# Altium PCB PCB1.PcbDoc
Units mm, origin at the board's own origin, x right, y up, seen from the top; angles counter-clockwise.
Board outline 82 x 67 mm, 2 copper layers (Top Layer, Bottom Layer); 41 components, 35 nets, 232 pads, 99 vias.
Unrouted connection lines stored in the file: 26.
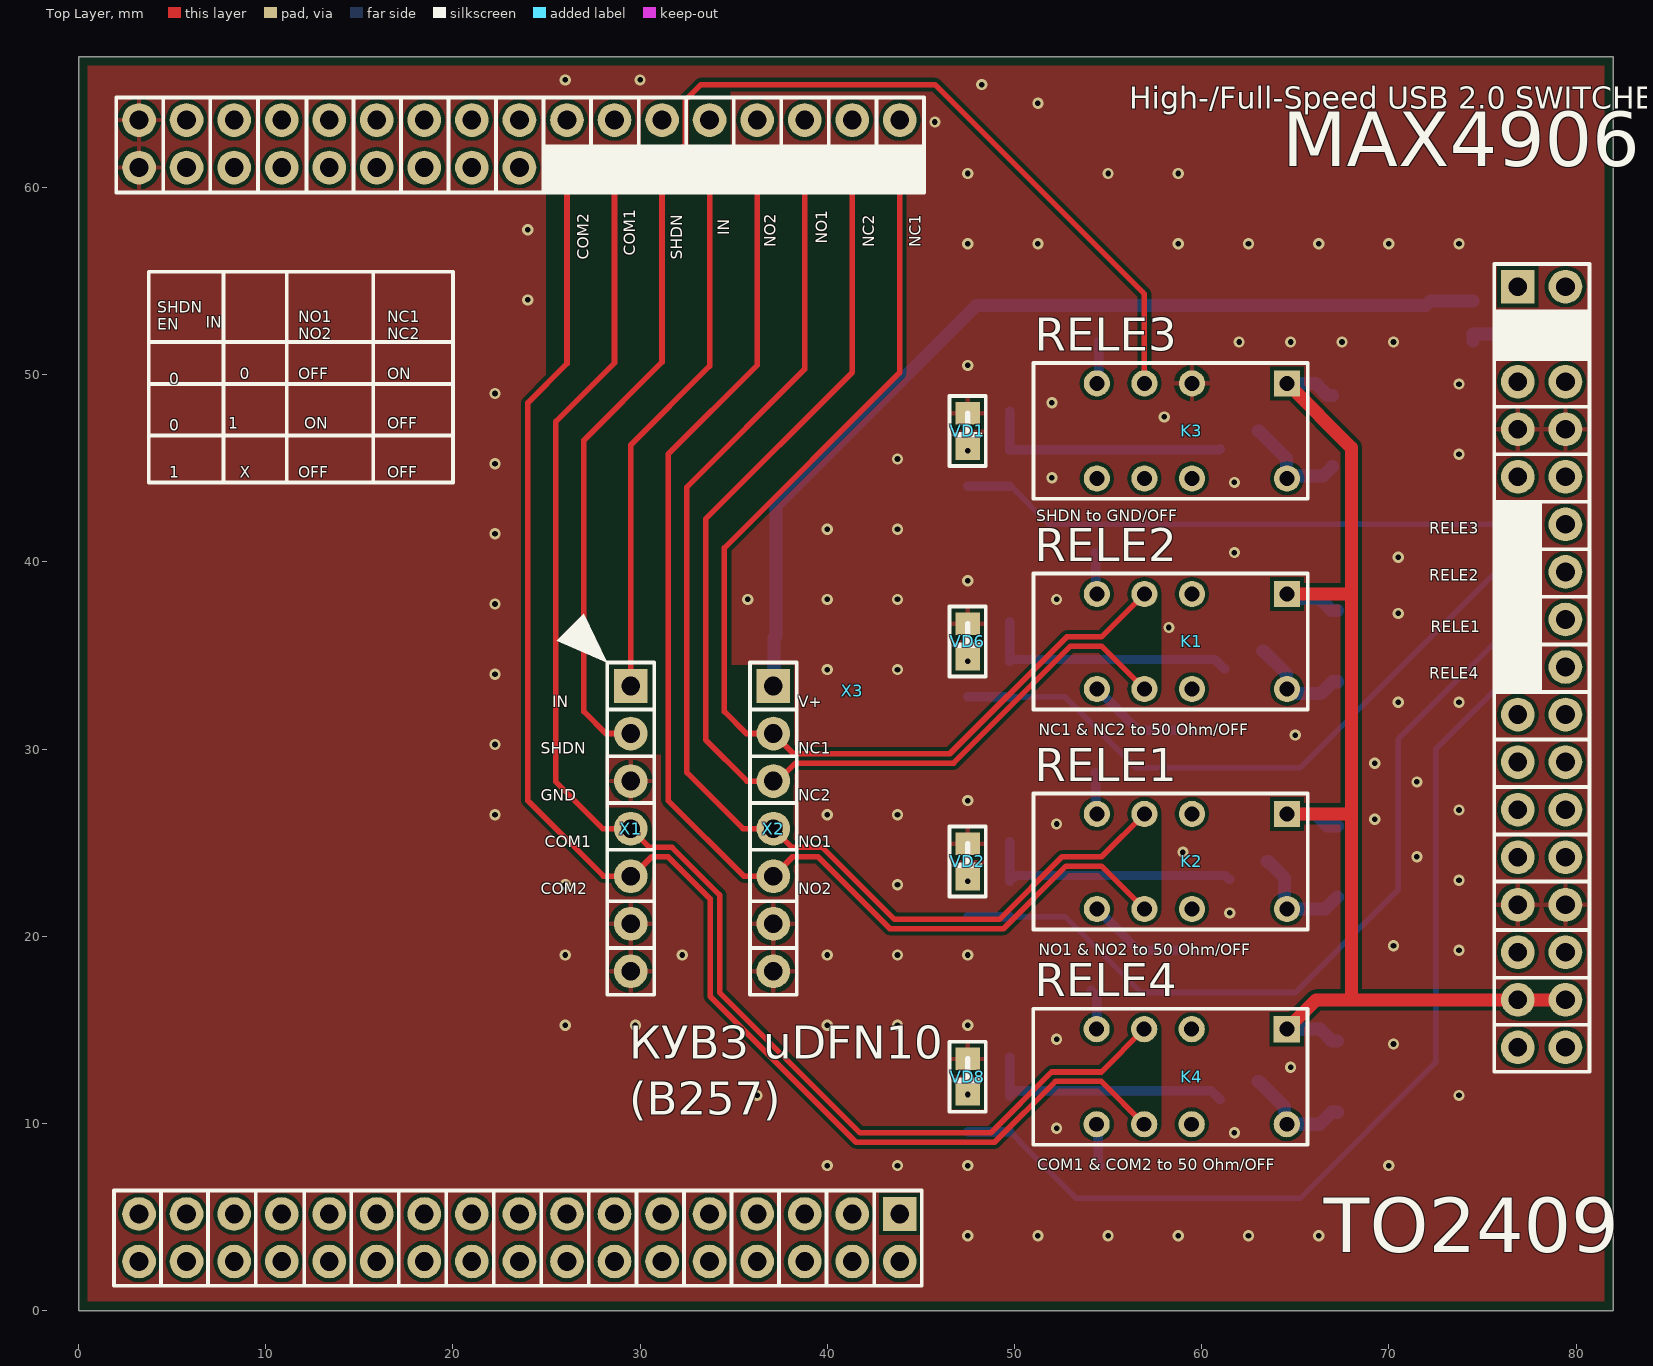
[diagram p0: Top Layer view]
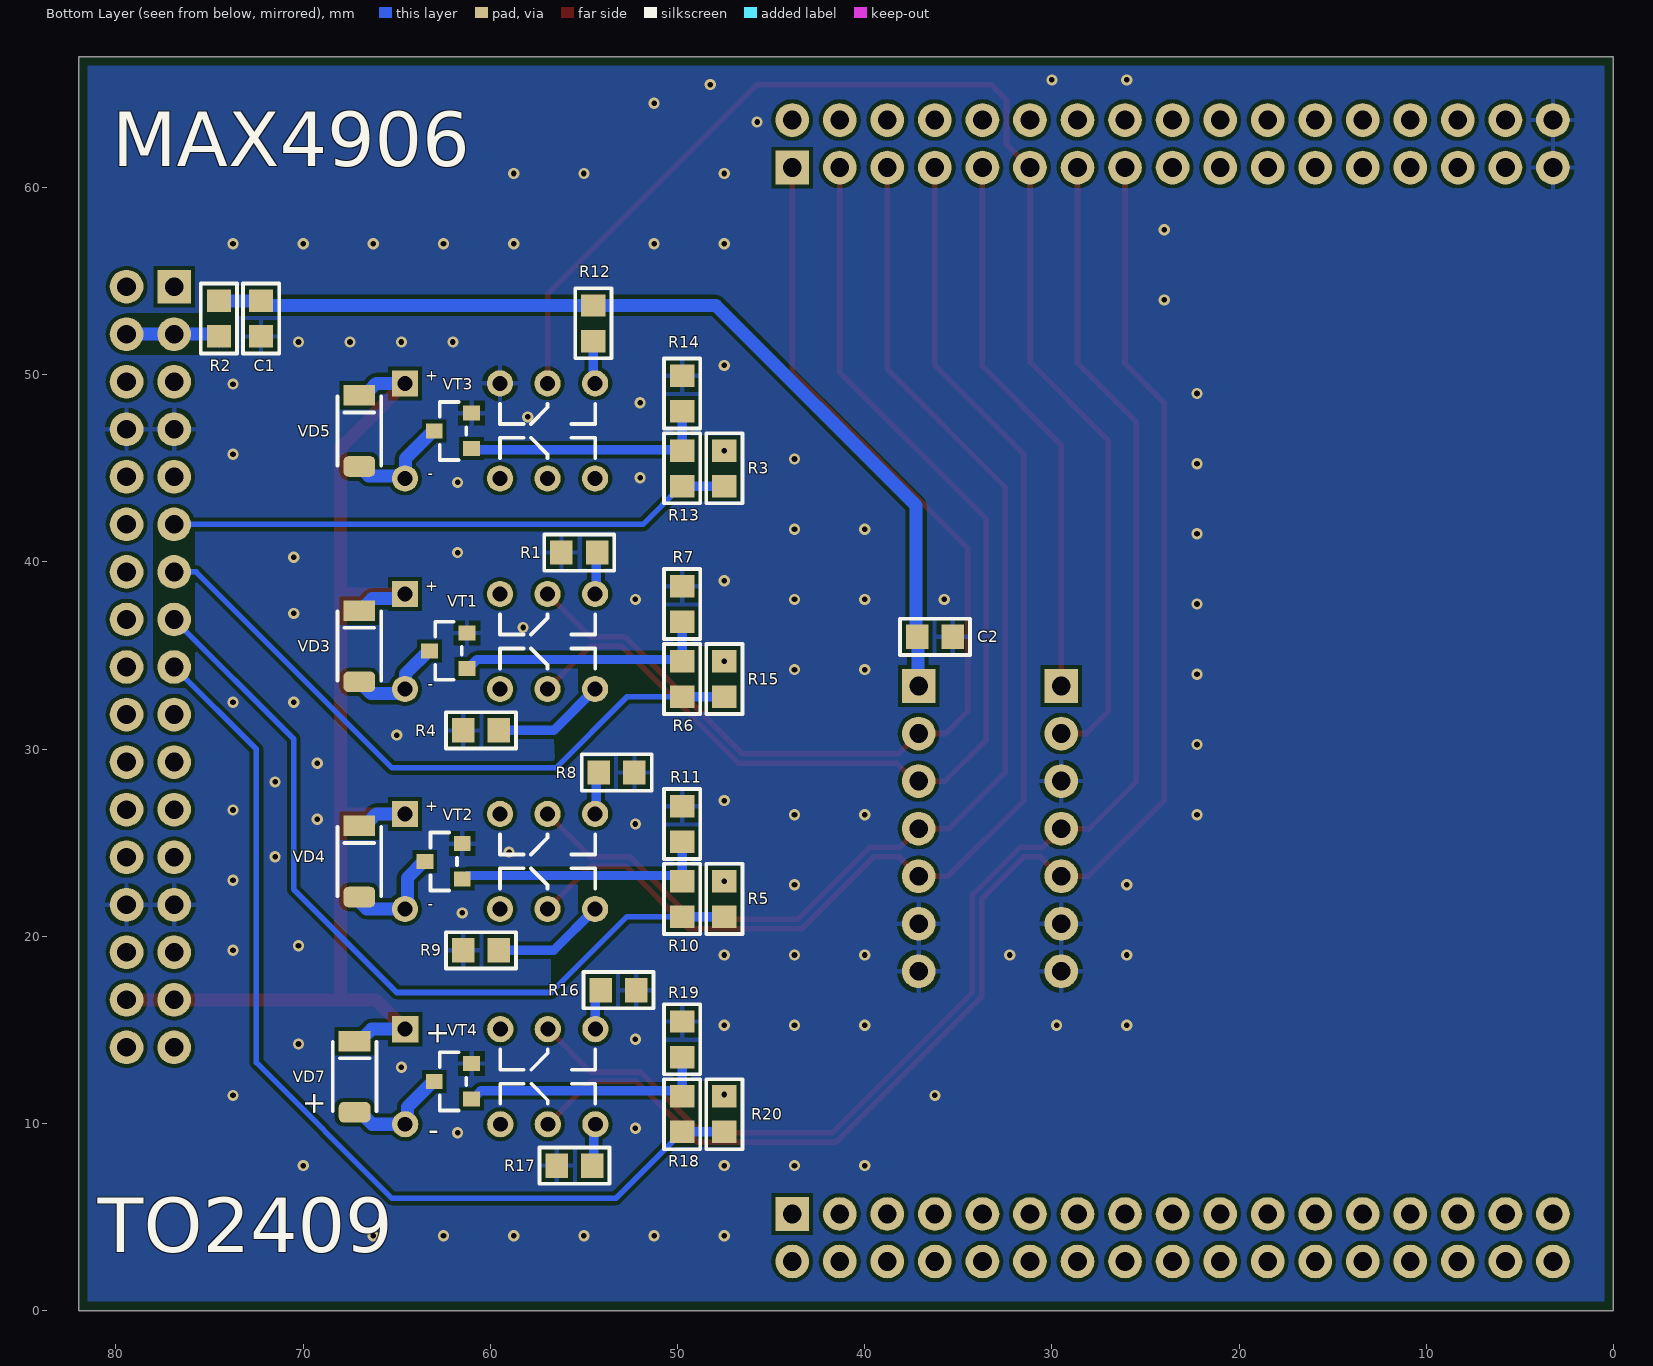
[diagram p1: Bottom Layer view, seen from below]

## Layer stack, top to bottom
Top Solder: solder mask 0.0102, Solder Resist, Dk 3.5
Top Layer: signal copper 0.0356
Dielectric 1: dielectric 0.32, FR-4, Dk 4.8
Bottom Layer: signal copper 0.0356
Bottom Solder: solder mask 0.0102, Solder Resist, Dk 3.5

## Board outline
0,0 82,0 82,67 0,67

## Design rules (kind name [scope] priority, off if disabled: settings)
Clearance [All] p1: gap=0.2 ignorepadtopadclearanceinfootprint=FALSE except(0: Arc-Hole Track-Hole SMDPad-Hole THPad-Hole Via-Hole Fill-Hole Poly-Hole Region-Hole Text-Hole)
PolygonConnect [InNet('GND')] p1: thpad.connectstyle=Relief thpad.reliefconductorwidth=0.254 thpad.reliefentries=4 thpad.polygonreliefangle="90 Angle" thpad.airgapwidth=0.254 smdpad.connectstyle=Relief smdpad.reliefconductorwidth=0.254 smdpad.reliefentries=4 smdpad.polygonreliefangle="90 Angle" smdpad.airgapwidth=0.254 via.connectstyle=Direct via.reliefconductorwidth=0.254 via.reliefentries=4 via.polygonreliefangle="90 Angle" via.airgapwidth=0.254
RoutingVias [All] p1: holewidth=0.3 width=0.6 viastyle="Through Hole" minholewidth=0.3 minwidth=0.6 maxholewidth=0.6 maxwidth=1.2
SilkToSilkClearance [All] p1: silktosilkclearance=0
SilkToSolderMaskClearance [IsPad] p1: minsilkscreentomaskgap=0 clearancetoexposedcopper=TRUE
SolderMaskExpansion [All] p1: expansion=0.102 istentingtop=FALSE
Width [All] p1: maxlimit=1 minlimit=0.2 preferedwidth=0.3
28 further rules are at their usual default settings.

## Components (designator, comment, footprint, x,y, rotation, side; value= is the part's Value field where it differs from the comment)
C1 "10uF" 0805 72.25,53 r270 bottom
C2 "10nF" 0805 36.25,36 r180 bottom
K1 "V23079A1001B301 TE" V23079A1001B301 58.262,35.75 r180 top
K2 "V23079A1001B301 TE" V23079A1001B301 58.262,24 r180 top
K3 "V23079A1001B301 TE" V23079A1001B301 58.262,47 r180 top
K4 "V23079A1001B301 TE" V23079A1001B301 58.25,12.5 r180 top
R1 "50" 0805 55.25,40.5 r0 bottom
R2 "1" 0805 74.5,53 r90 bottom
R3 "1.5k" 0805 47.5,45 r90 bottom
R4 "50" 0805 60.5,31 r0 bottom
R5 "1.5k" 0805 47.5,22 r90 bottom
R6 "1k" 0805 49.75,33.75 r90 bottom
R7 "20k" 0805 49.75,37.75 r90 bottom
R8 "50" 0805 53.25,28.75 r180 bottom
R9 "50" 0805 60.5,19.25 r0 bottom
R10 "1k" 0805 49.75,22 r90 bottom
R11 "20k" 0805 49.75,26 r90 bottom
R12 "10k" 0805 54.5,52.75 r90 bottom
R13 "1k" 0805 49.75,45 r90 bottom
R14 "20k" 0805 49.75,49 r90 bottom
R15 "1.5k" 0805 47.5,33.75 r90 bottom
R16 "50" 0805 53.154,17.123 r180 bottom
R17 "50" 0805 55.5,7.75 r0 bottom
R18 "1k" 0805 49.75,10.5 r90 bottom
R19 "20k" 0805 49.75,14.5 r90 bottom
R20 "1.5k" 0805 47.5,10.5 r90 bottom
VD1 "LED(0805)" 0805(LED) 47.5,47 r90 top
VD2 "LED(0805)" 0805(LED) 47.5,24 r90 top
VD3 "LL4148 NXP" SOD80C 67,35.5 r90 bottom
VD4 "LL4148 NXP" SOD80C 67,24 r90 bottom
VD5 "LL4148 NXP" SOD80C 67,47 r90 bottom
VD6 "LED(0805)" 0805(LED) 47.5,35.75 r90 top
VD7 "LL4148 NXP" SOD80C 67.25,12.5 r90 bottom
VD8 "LED(0805)" 0805(LED) 47.5,12.5 r90 top
VT1 "MMBT5551L" SOT-23 62.25,35.25 r90 bottom
VT2 "MMBT5551L" SOT-23 62.5,24 r90 bottom
VT3 "MMBT5551L" SOT-23 62,47 r90 bottom
VT4 "MMBT5551L" SOT-23 62,12.25 r90 bottom
X1 "PBS-7" PBS7-2.54 29.5,33.372 r0 top
X2 "PBS-7" PBS7-2.54 37.12,33.372 r0 top
X3 "FORMULA" FORMULA 31.693,31.847 r0 top locked

## Footprints (in the part's own frame and the unit in brackets; to place one, negate y for a bottom-side part, rotate by r counter-clockwise, add the part's x,y. Pads: shape width x height; smd on the part's side, far side on the other; paste and mask are expansions set on the pad)
0805 [mm]
  rect 1.2x1.3 smd: 1(-0.95,0) 2(0.95,0)
  silkscreen extent -1.87,-0.97 1.87,0.97, body extent -1.05,-0.63 0.95,0.63, height 0.55
0805(LED) [mm]
  rect 1.2x1.3 smd: 1(-0.95,0) 2(0.95,0)
  silkscreen extent -1.87,-0.97 1.87,0.97, body extent -1.03,-0.41 1.03,0.5, height 0.85
FORMULA [mm]
  rect 1.8x1.8 hole 1: 1(12.18,29.22) VDDF(12.18,-26.68) VEEF(45.2,22.86)
  round 1.8 hole 1: 2(9.64,29.22) 3(7.1,29.22) 4(4.56,29.22) 5(2.02,29.22) 6(-0.52,29.22) 7(-3.06,29.22) 8(-5.6,29.22) 9(-8.14,29.22) 10(-10.68,29.22) 11(-13.22,29.22) 12(-15.76,29.22) 13(-18.3,29.22) 14(-20.84,29.22) 15(-23.38,29.22) 16(-25.92,29.22) 17(12.18,31.76) 18(9.64,31.76) 19(7.1,31.76) 20(4.56,31.76) 21(2.02,31.76) 22(-0.52,31.76) 23(-3.06,31.76) 24(-5.6,31.76) 25(-8.14,31.76) 26(-10.68,31.76) 27(-13.22,31.76) 28(-15.76,31.76) 29(-18.3,31.76) 30(-20.84,31.76) 31(-23.38,31.76) 32(-25.92,31.76) 33(-28.46,-29.22) 34(-25.92,-29.22) 35(-23.38,-29.22) 36(-20.84,-29.22) 37(-18.3,-29.22) 38(-15.76,-29.22) 39(-13.22,-29.22) 40(-10.68,-29.22) 41(-8.14,-29.22) 42(-5.6,-29.22) 43(-3.06,-29.22) 44(-0.52,-29.22) 45(2.02,-29.22) 46(4.56,-29.22) 47(7.1,-29.22) 48(9.64,-29.22) 49(-28.46,-26.68) 50(-25.92,-26.68) 51(-23.38,-26.68) 52(-20.84,-26.68) 53(-18.3,-26.68) 54(-15.76,-26.68) 55(-13.22,-26.68) 56(-10.68,-26.68) 57(-8.14,-26.68) 58(-5.6,-26.68) 59(-3.06,-26.68) 60(-0.52,-26.68) 61(2.02,-26.68) 62(4.56,-26.68) 63(7.1,-26.68) 64(9.64,-26.68) +5V(45.2,-15.24) +5V(47.74,-15.24) +5V_VCCF(45.2,20.32) +5V_VCCS(47.74,20.32) +5V_VDDF(45.2,17.78) +5V_VDDS(47.74,17.78) +12V(45.2,-12.7) +12V(47.74,-12.7) -12V(45.2,-17.78) -12V(47.74,-17.78) GND(-28.46,29.22) GND(-28.46,31.76) GND(45.2,-10.16) GND(45.2,15.24) GND(47.74,-10.16) GND(47.74,15.24) IN-OUT1(47.74,10.16) IN-OUT2(47.74,7.62) IN-OUT3(47.74,5.08) IN-OUT4(47.74,2.54) IN-OUT5(47.74,0) IN-OUT6(47.74,-2.54) IN-OUT7(47.74,-5.08) IN-OUT8(47.74,-7.62) NC(45.2,12.7) NC(47.74,12.7) OUT1(45.2,10.16) OUT2(45.2,7.62) OUT3(45.2,5.08) OUT4(45.2,2.54) OUT5(45.2,0) OUT6(45.2,-2.54) OUT7(45.2,-5.08) OUT8(45.2,-7.62) VDDS(12.18,-29.22) VEES(47.74,22.86)
  silkscreen extent -29.8,-30.51 49.02,32.97, body extent -29.79,-30.4 48.98,32.92, height 3
PBS7-2.54 [mm]
  rect 1.8x1.8 hole 1: 1(0,0)
  round 1.8 hole 1: 2(0,-2.54) 3(0,-5.08) 4(0,-7.62) 5(0,-10.16) 6(0,-12.7) 7(0,-15.24)
  silkscreen extent -1.25,-16.5 1.25,1.25
SOD80C [mm]
  rrect50% 1.1x1.7 smd: 1(-1.9,0)
  rect 1.1x1.7 smd: 2(1.9,0)
  silkscreen extent -1.85,-1.17 1.85,1.17, body extent -1.9,-0.8 1.8,0.8, height 1.55
SOT-23 [mm]
  rect 0.8x0.9 smd: 1(-0.95,-1) 1(-0.95,-1) 2(0.95,-1) 2(0.95,-1) 3(0,1) 3(0,1)
  silkscreen extent -1.55,-0.72 1.55,0.7, body extent -1.5,-1.25 1.5,1.25, height 1.05
V23079A1001B301 [mm]
  rect 1.4x1.4 hole 0.8: 1(-6.3,-2.54)
  round 1.4 hole 0.8: 3(-1.22,-2.54) 4(1.32,-2.54) 5(3.86,-2.54) 8(3.86,2.54) 9(1.32,2.54) 10(-1.22,2.54) 12(-6.3,2.54)
  silkscreen extent -7.4,-3.63 7.25,3.63, body extent -7.25,-3.6 7.25,3.6, height 9.4

## Part data
C1 C2: library part C0805, ComponentHeigt=1.3, Firme=AVX, KIND=Конденсатор, Leadform=SMD, Packaging=0805
R1 R2 R3 R4 R5 R6 R7 R8 R9 R10 R11 R12 R13 R14 R15 R16 R17 R18 R19 R20: library part "R0805 Yageo", ComponentHeigt=0.6, Firme=Yageo, KIND=Резистор, Leadform=SMD, Packaging=0805
VD1 VD2 VD6 VD8: ComponentHeigt=0.75, Firme=Kingbright, KIND="Светодиод L-1154GD Kingbright", Leadform="в отверстия", NN=24003000
VD3 VD4 VD5 VD7: Component Link=http://www.nxp.com, ComponentHeigt=1.6, Firme=NXP, KIND="Диод LL4148 NXP", Leadform=SMD, NN=24009301, Packaging=SOD-80C
VT1 VT2 VT3 VT4: ComponentHeigt=1.1, Firme=ONS, KIND="Транзистор MMBT5551L*G ONS", Leadform=SMD, NN=24007468, Packaging=SOT-23

## Via types
v1: diameter 0.6, hole 0.3, Top Layer to Bottom Layer, tented both sides, 99 vias

## Nets (pads, with @x,y where several pads share a name; then routed paths per layer and width w, separated by ;. In a path a pad name is that pad's centre, name@x,y a point inside that pad or via, vN(x,y) a via of type N, cw(c..) or ccw(c..) an arc to the next point about the centre after c; other vN are vias at no path point)
+3.3V_VCC: R2.1 X3.+5V_VCCF X3.+5V_VCCS | length 5.3
  Bottom Layer w0.7: R2.1@74.484,52.067 R2.1 ; R2.1@74.5,51.8 74.5,52.167 X3.+5V_VCCF ; X3.+5V_VCCF@76.877,52.183 X3.+5V_VCCF ; X3.+5V_VCCS X3.+5V_VCCF
+5V_CONST: K1.1 K2.1 K3.1 K4.1 VD3.2 VD4.2 VD5.2 VD7.2 X3.+5V | length 68
  Top Layer w0.7: K4.1 66.117,16.607 76.893,16.607 X3.+5V@79.433,16.607 ; K2.1 67.75,26.54 ; K1.1 68,38.29 ; K3.1 68,46.102 68,38.29 ; 68,16.75 68,38.29
  Bottom Layer w0.7: K4.1 66.34,15.04 66.75,14.63 66.75,14.6 66.95,14.4 VD7.2 ; K2.1 66.09,26.54 66.5,26.13 66.5,26.1 66.7,25.9 VD4.2 VD4.2@67.25,25.9 ; K1.1@64.562,38.04 66.312,38.04 66.75,37.602 66.75,37.6 66.95,37.4 VD3.2 VD3.2@67.25,37.4 ; K3.1 66.09,49.54 66.5,49.13 66.5,49.1 66.7,48.9 VD5.2
COM1: K4.4 X1.4 X3.7 | length 78.7
  Top Layer w0.3: X3.7 28.633,50.633 25.5,47.5 25.5,28.25 27.998,25.752 X1.4 30.502,24.75 31.707,24.75 34.25,22.207 34.25,17 41.75,9.5 48.734,9.5 51.984,12.75 54.64,12.75 K4.4
COM2: K4.9 X1.5 X3.8 | length 81.4
  Top Layer w0.3: X3.8 26.093,50.593 24,48.5 24,27.25 28.038,23.212 29.585,23.212 30.623,24.25 31.5,24.25 33.75,22 33.75,16.793 41.543,9 48.941,9 52.191,12.25 54.64,12.25 K4.9
GND: C1.2 C2.2 K3.3 R1.2 R4.2 R7.2 R8.2 R9.2 R11.2 R14.2 R16.2 R17.2 R19.2 VD1.2 VD2.2 VD6.2 VD8.2 VT1.2 VT2.2 VT3.2 VT4.2 X1.3 X1.6 X1.7 X2.6 X2.7 X3.GND
  other v1: 47.5,4 51.25,4 55,4 58.75,4 62.5,4 66.25,4 40,7.75 43.75,7.75 47.5,7.75 70,7.75 61.75,9.5 52.25,9.75 36.25,11.5 73.75,11.5 64.75,13 70.25,14.25 52.25,14.5 26,15.25 29.75,15.25 40,15.25 43.75,15.25 47.5,15.25 26,19 32.25,19 40,19 43.75,19 47.5,19 73.75,19.25 70.25,19.5 61.5,21.25 26,22.75 43.75,22.75 73.75,23 71.5,24.25 59,24.5 52.25,26 69.25,26.25 22.25,26.5 40,26.5 43.75,26.5 73.75,26.75 47.5,27.25 71.5,28.25 69.25,29.25 22.25,30.25 65,30.75 70.5,32.5 73.75,32.5 22.25,34 40,34.25 43.75,34.25 58.25,36.5 70.5,37.25 22.25,37.75 35.75,38 40,38 43.75,38 52.25,38 47.5,39 70.5,40.25 61.75,40.5 22.25,41.5 40,41.75 43.75,41.75 61.75,44.25 52,44.5 22.25,45.25 43.75,45.5 73.75,45.75 58,47.75 52,48.5 22.25,49 73.75,49.5 47.5,50.5 62,51.75 64.75,51.75 67.5,51.75 70.25,51.75 24,54 47.5,57 51.25,57 58.75,57 62.5,57 66.25,57 70,57 73.75,57 24,57.75 47.5,60.75 55,60.75 58.75,60.75 45.75,63.5 51.25,64.5 48.25,65.5 26,65.75 30,65.75
IN: X1.1 X3.5 | length 29.4
  Top Layer w0.3: X1.1 29.5,46.25 33.713,50.463 X3.5
NC1: K1.4 X2.2 X3.1 | length 59.9
  Top Layer w0.3: X3.1 43.873,50.123 34.5,40.75 34.5,32 35.668,30.832 X2.2 38.202,29.75 46.543,29.75 52.793,36 54.652,36 K1.4
NC2: K1.9 X2.3 X3.2 | length 62.1
  Top Layer w0.3: X3.2 41.333,50.119 33.5,42.286 33.5,30.5 35.708,28.292 X2.3 37.338,28.292 38.296,29.25 46.75,29.25 53,35.5 54.652,35.5 K1.9
NetK1_5: K1.5 R1.1 | length 2.5
  Bottom Layer w0.5: R1.1 54.351,40.449 54.351,38.091 K1.5@54.402,38.04
NetK1_8: K1.8 R4.1 | length 6.1
  Bottom Layer w0.5: K1.8 56.612,31 R4.1
NetK1_12: K1.12 VD3.1 VT1.3 | length 5.8
  Bottom Layer w0.7: VT1.3@63.25,35.25 63.3,35.25 64.539,34.011 64.539,32.983 64.562,32.96 64.564,32.962 66.362,32.962 VD3.1 VD3.1@67.25,33.6
NetK2_5: K2.5 R8.1 | length 2.3
  Bottom Layer w0.5: R8.1@54.3,28.75 54.351,28.699 54.351,26.591 K2.5
NetK2_8: K2.8 R9.1 | length 6.1
  Bottom Layer w0.5: K2.8 56.612,19.25 R9.1
NetK2_12: K2.12 VD4.1 VT2.3 | length 6
  Bottom Layer w0.7: VT2.3@63.5,24 63.55,24 64.428,23.122 64.428,21.594 K2.12 K2.12 66.612,21.462 VD4.1@67.25,22.1
NetK3_5: K3.5 R12.1 | length 2.4
  Bottom Layer w0.5: K3.5 54.5,49.54 R12.1
NetK3_12: K3.12 VD5.1 VT3.3 | length 5.9
  Bottom Layer w0.7: VT3.3@63,47 63.05,47 64.539,45.511 64.539,44.483 K3.12 64.696,44.594 66.494,44.594 VD5.1
NetK4_5: K4.5 R16.1 | length 2.2
  Bottom Layer w0.5: R16.1 54.39,16.837 K4.5
NetK4_8: K4.8 R17.1 | length 2.3
  Bottom Layer w0.5: K4.8 54.47,9.88 54.47,7.83 R17.1
NetK4_12: K4.12 VD7.1 VT4.3 | length 5.9
  Bottom Layer w0.7: VT4.3@63,12.25 63.05,12.25 64.416,10.884 64.416,10.094 K4.12 66.31,9.96 66.95,10.6 VD7.1
NetR3_2: R3.2 VD1.1
  other v1: 47.5,45.95
NetR5_2: R5.2 VD2.1
  other v1: 47.5,22.95
NetR6_2: R6.2 R7.1 VT1.1 | length 13.8
  Bottom Layer w0.5: R7.1 R6.2 49.841,34.791 60.709,34.791 61.2,34.3 VT1.1@61.25,34.3
NetR10_2: R10.2 R11.1 VT2.1 | length 14.1
  Bottom Layer w0.5: R11.1 R10.2 50.05,23.25 61.25,23.25 61.45,23.05 VT2.1@61.5,23.05
NetR13_2: R13.2 R14.1 VT3.1 | length 13.4
  Bottom Layer w0.5: R14.1 R13.2 49.8,46 60.95,46 VT3.1@61,46.05
NetR15_2: R15.2 VD6.1
  other v1: 47.5,34.7
NetR18_2: R18.2 R19.1 VT4.1 | length 13.7
  Bottom Layer w0.5: R19.1 R18.2 50.05,11.75 60.507,11.75 60.8,11.457 60.8,11.45 60.95,11.3 VT4.1@61,11.3
NetR20_2: R20.2 VD8.1
  other v1: 47.5,11.55
NO1: K2.4 X2.4 X3.3 | length 64.9
  Top Layer w0.3: X3.3 38.793,50.293 32.5,44 32.5,28.75 35.498,25.752 X2.4 38.122,24.75 39.75,24.75 43.596,20.904 49.197,20.904 52.543,24.25 54.652,24.25 K2.4
NO2: K2.9 X2.5 X3.4 | length 67.3
  Top Layer w0.3: X3.4 36.253,50.503 31.5,45.75 31.5,27.25 35.538,23.212 X2.5 38.158,24.25 39.5,24.25 43.346,20.404 49.404,20.404 52.75,23.75 54.652,23.75 K2.9
RELE1: R5.1 R10.1 X3.OUT3 | length 44
  Bottom Layer w0.3: R10.1 52.7,21.05 56.75,17 65,17 70.5,22.5 70.5,30.534 X3.OUT3
  Bottom Layer w0.5: R5.1 R10.1
RELE2: R6.1 R15.1 X3.OUT2 | length 35.3
  Bottom Layer w0.3: R6.1 52.7,32.8 56.5,29 65.25,29 75.717,39.467 X3.OUT2
  Bottom Layer w0.5: R15.1 R6.1
RELE3: R3.1 R13.1 X3.OUT1 | length 30.2
  Bottom Layer w0.3: R13.1 49.8,44.05 51.843,42.007 X3.OUT1
  Bottom Layer w0.5: R3.1 R13.1
RELE4: R18.1 R20.1 X3.OUT4 | length 52.5
  Bottom Layer w0.3: R18.1 49.8,9.55 50.25,9.1 50.25,9.05 53.3,6 65.25,6 72.5,13.25 72.5,29.994 X3.OUT4
  Bottom Layer w0.5: R20.1 R18.1
SHDN: K3.4 X1.2 X3.6 | length 72.2
  Top Layer w0.3: X1.2 28.168,30.832 27,32 27,46.5 31.173,50.673 X3.6 32.423,62.317 32.423,64.673 33.25,65.5 45.75,65.5 56.942,54.308 K3.4
VCC: C1.1 C2.1 R2.2 R12.2 X2.1 | length 51.5
  Bottom Layer w0.7: X2.1 37.16,33.412 37.16,35.96 C2.1 37.25,36.05 37.25,43 47.95,53.7 71.95,53.7 72.2,53.95 C1.1 R2.2
pads on no net: K1.3 K1.10 K2.3 K2.10 K3.8 K3.9 K3.10 K4.3 K4.10 X3.9 X3.10 X3.11 X3.12 X3.13 X3.14 X3.15 X3.16 X3.17 X3.18 X3.19 X3.20 X3.21 X3.22 X3.23 X3.24 X3.25 X3.26 X3.27 X3.28 X3.29 X3.30 X3.31 X3.32 X3.33 X3.34 X3.35 X3.36 X3.37 X3.38 X3.39 X3.40 X3.41 X3.42 X3.43 X3.44 X3.45 X3.46 X3.47 X3.48 X3.49 X3.50 X3.51 X3.52 X3.53 X3.54 X3.55 X3.56 X3.57 X3.58 X3.59 X3.60 X3.61 X3.62 X3.63 X3.64 X3.+5V_VDDF X3.+5V_VDDS X3.+12V X3.-12V X3.IN-OUT1 X3.IN-OUT2 X3.IN-OUT3 X3.IN-OUT4 X3.IN-OUT5 X3.IN-OUT6 X3.IN-OUT7 X3.IN-OUT8 X3.NC X3.OUT5 X3.OUT6 X3.OUT7 X3.OUT8 X3.VDDF X3.VDDS X3.VEEF X3.VEES

## Polygon pours and split planes (outlines as drawn)
GND on Bottom Layer "NONET_L-01_P-001" (solid, remove dead copper, pour order 1): 0.5,66.5 0.5,0.5 81.5,0.5 81.5,66.5
GND on Top Layer "NONET_L-01_P-001" (solid, remove dead copper, pour order 0): 0.5,66.5 0.5,0.5 81.5,0.5 81.5,66.5

## Other copper
Top Layer:
  pour cut-out: 38.22,34.472 38.22,28.292 37.12,28.292
  pour cut-out: 38.22,34.472 34.5,34.472 34.5,33
  pour cut-out: 37.12,31.941 34.75,31.941 34.75,31.25
  pour cut-out: 57.838,15.04 57.838,9.96 56.93,9.96
  pour cut-out: 57.85,26.54 57.85,21.46 56.942,21.46
  pour cut-out: 57.85,38.29 57.85,33.21 56.942,33.21
  pour cut-out: 31.173,64.716 33.713,64.716 33.713,63.607
  pour cut-out: 76.893,17.716 79.433,17.716 79.433,16.607
  pour cut-out: 79.433,15.498 76.893,15.498 76.893,16.607
  pour cut-out: 41.333,62.176 43.873,62.176 43.873,61.067
  pour cut-out: 38.192,31.119 38.192,23.212 37.162,23.212
  pour cut-out: 29.5,29.723 32.25,29.723 32.25,33
  pour cut-out: 34.822,63.607 34.822,61.067 33.713,61.067
  pour cut-out: 34.822,63.607 34.822,65.5 33.25,65.5
  pour cut-out: 41.333,62.176 31.173,62.176 31.173,60.697
  pour cut-out: 30.064,63.607 30.064,61.067 31.173,61.067
  pour cut-out: 24.984,61.067 24.984,48.5 26.5,48.5
  pour cut-out: 25.806,62.139 31.173,62.139 31.173,61.067
  pour cut-out: 30.609,25.752 30.609,23.212 29.5,23.212
  pour cut-out: 29.5,26.861 27.25,26.861 27.25,26.25
  pour cut-out: 28.146,26.109 28.146,31.236 25,31.236
  pour cut-out: 29.5,29.723 25,29.723 25,32.75
  pour cut-out: 30.6,34.472 30.6,30.832 29.5,30.832
Bottom Layer:
  pour cut-out: 55.31,21.46 55.31,23.25 54.5,23.25
  pour cut-out: 56.75,17 56.75,19.5 56.25,19.5
  pour cut-out: 55.31,33.21 55.31,34.75 54.5,34.75
  pour cut-out: 56.5,29 56.5,31 56.612,31
  pour cut-out: 76.893,33.278 75.784,33.278 75.784,34.387
  pour cut-out: 78.002,34.387 78.002,36.927 76.893,36.927
  pour cut-out: 75.784,36.927 75.784,34.387 76.893,34.387
  pour cut-out: 71.4,54.75 71.4,53.15 75.35,53.15 75.35,54.75
  pour cut-out: 76.893,51.058 73.64,51.058 73.64,54.074
  pour cut-out: 76.893,53.276 74.5,53.276 74.5,52.167
  pour cut-out: 73.65,51.25 73.65,54.75 75.35,54.75 75.35,51.25
  pour cut-out: 46.65,12.25 46.65,8.75 50.6,8.75 50.6,12.25
  pour cut-out: 46.65,35.5 46.65,32 50.6,32 50.6,35.5
  pour cut-out: 46.65,23.75 46.65,20.25 50.6,20.25 50.6,23.75
  pour cut-out: 78.002,39.467 78.002,36.927 76.893,36.927
  pour cut-out: 75.784,39.467 75.784,36.927 76.893,36.927
  pour cut-out: 78.002,42.007 78.002,39.467 76.893,39.467
  pour cut-out: 75.784,42.007 75.784,39.467 76.893,39.467
  pour cut-out: 76.893,53.276 79.433,53.276 79.433,52.167
  pour cut-out: 76.893,51.058 79.433,51.058 79.433,52.167
  pour cut-out: 46.65,46.75 46.65,43.25 50.6,43.25 50.6,46.75
  pour cut-out: 53.65,54.5 53.65,51 55.35,51 55.35,54.5

## Silkscreen, mask and mechanical layers (free items; w line width, h text height)
Top Overlay:
  region: 75.636,43.215 75.636,33.055 78.176,33.055 78.176,43.215
  region: 75.636,53.375 75.636,50.835 80.716,50.835 80.716,53.375
  region: 45.163,62.277 45.163,59.737 24.843,59.737 24.843,62.277
  region: 28.25,34.622 26.988,37.238 25.546,35.796
  lines w0.2: 3.75,46.75 20,46.75 ; 3.75,49.5 20,49.5 ; 7.75,44.25 7.75,55.5 ; 11.125,44.25 11.125,55.5 ; 15.75,44.25 15.75,55.5 ; 3.75,51.75 3.75,55.5 20,55.5 20,51.75 ; 3.75,51.75 3.75,44.25 20,44.25 20,51.75 ; 3.75,51.75 20,51.75
  text "High-/Full-Speed USB 2.0 SWITCHES" at 56.132,63.813 h2
  text "MAX4906" at 64.304,60.169 h5
  text "IN" at 34.75,57.45 h0.6 r90
  text "NO1" at 40,57 h0.6 r90
  text "NO2" at 37.25,56.8 h0.6 r90
  text "NC2" at 42.5,56.8 h0.6 r90
  text "NC1" at 45,56.8 h0.6 r90
  text "COM1" at 29.75,56.351 h0.6 r90
  text "COM2" at 27.25,56.151 h0.6 r90
  text "SHDN" at 32.25,56.151 h0.6 r90
  text "IN" at 6.801,52.5 h0.6
  text "SHDN / EN" at 4.2,52.4 h0.6
  text "NO1 / NO2" at 11.75,51.9 h0.6
  text "NC1 / NC2" at 16.5,51.9 h0.6
  text "RELE3" at 51.081,50.702 h3
  text "0" at 8.6,49.75 h0.6
  text "OFF" at 11.75,49.75 h0.6
  text "ON" at 16.5,49.75 h0.6
  text "0" at 4.85,49.5 h0.6
  text "1" at 8,47.125 h0.6
  text "ON" at 12.05,47.125 h0.6
  text "OFF" at 16.5,47.125 h0.6
  text "0" at 4.85,47 h0.6
  text "1" at 4.85,44.5 h0.6
  text "X" at 8.6,44.5 h0.6
  text "OFF" at 11.75,44.5 h0.6
  text "OFF" at 16.5,44.5 h0.6
  text "SHDN to GND/OFF" at 51.15,42.175 h0.6
  text "RELE3" at 72.15,41.5 h0.6
  text "RELE2" at 51.081,39.452 h3
  text "RELE2" at 72.15,39 h0.6
  text "RELE1" at 72.25,36.25 h0.6
  text "RELE4" at 72.15,33.75 h0.6
  text "IN" at 25.3,32.25 h0.6
  text "V+" at 38.45,32.25 h0.6
  text "NC1 & NC2 to 50 Ohm/OFF" at 51.301,30.75 h0.6
  text "SHDN" at 24.7,29.75 h0.6
  text "NC1" at 38.45,29.75 h0.6
  text "RELE1" at 51.082,27.702 h3
  text "GND" at 24.7,27.25 h0.6
  text "NC2" at 38.45,27.25 h0.6
  text "COM1" at 24.9,24.75 h0.6
  text "NO1" at 38.45,24.75 h0.6
  text "COM2" at 24.7,22.25 h0.6
  text "NO2" at 38.45,22.25 h0.6
  text "NO1 & NO2 to 50 Ohm/OFF" at 51.301,19 h0.6
  text "RELE4" at 51.082,16.202 h3
  text "КУВЗ uDFN10 / (B257)" at 29.42,9.882 h3
  text "COM1 & COM2 to 50 Ohm/OFF" at 51.206,7.5 h0.6
  text "ТО2409" at 66.528,2.169 h5
Bottom Overlay:
  text "MAX4906" at 80.196,60.169 h5
  text "ТО2409" at 80.972,2.169 h5
Board:
  the board outline again, w0.2

## Dimensions
82,67 to 82,0 on Dimensions
0,67 to 82,67 on Dimensions

## Text inside footprints (layer, text, board x,y; h text height)
K1: Bottom Overlay "+" at 63.482,38.95 h0.6 r180; Bottom Overlay "-" at 63.332,33.64 h0.6 r180
K2: Bottom Overlay "+" at 63.482,27.2 h0.6 r180; Bottom Overlay "-" at 63.332,21.89 h0.6 r180
K3: Bottom Overlay "+" at 63.482,50.2 h0.6 r180; Bottom Overlay "-" at 63.332,44.89 h0.6 r180
K4: Bottom Overlay "+" at 63.47,15.7 h2 r180; Bottom Overlay "-" at 63.32,10.39 h2 r180
VD7: Bottom Overlay "+" at 68.502,10.385 h2 r270